# Altium PCB IoT_Uni_Tem_PCB.PcbDoc
Units mm, origin at the board's own origin, x right, y up, seen from the top; angles counter-clockwise.
Board outline 85 x 58 mm, 2 copper layers (Top Layer, Bottom Layer), stack 1.671 mm thick; 28 components, 22 nets, 113 pads, 38 vias.
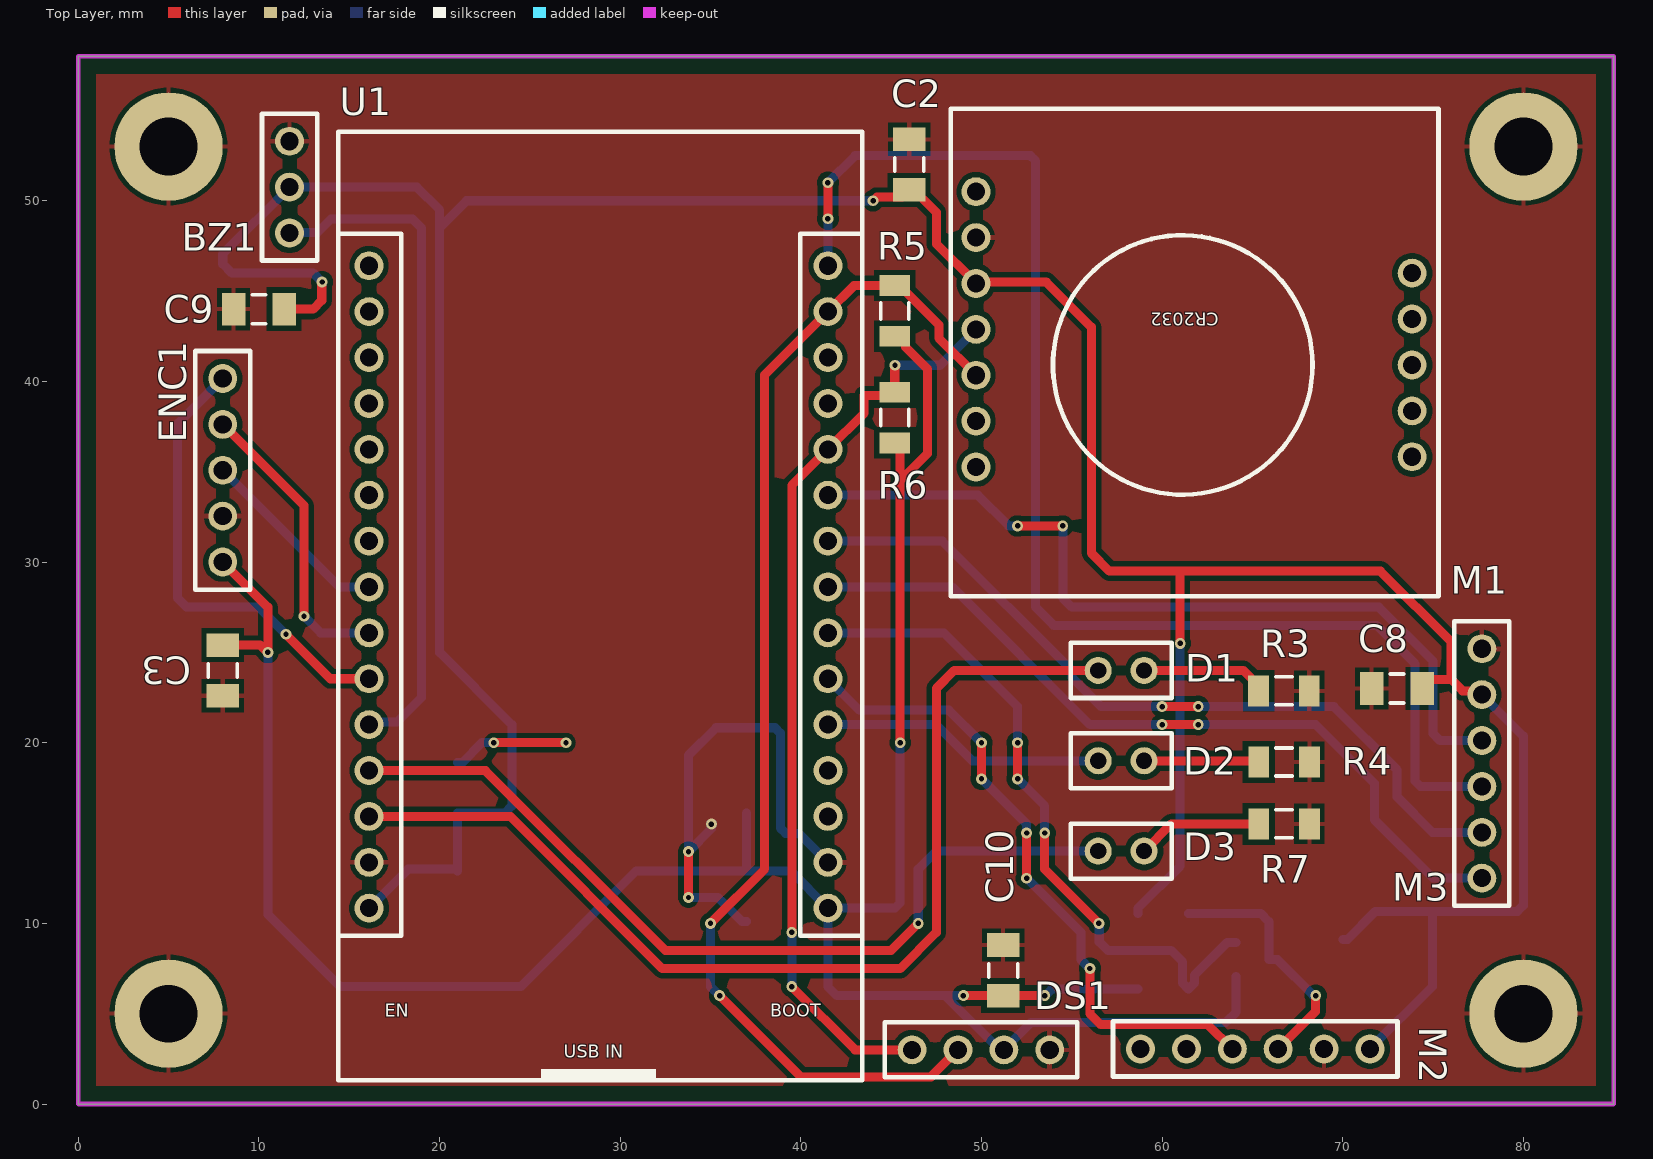
[diagram p0: Top Layer view]
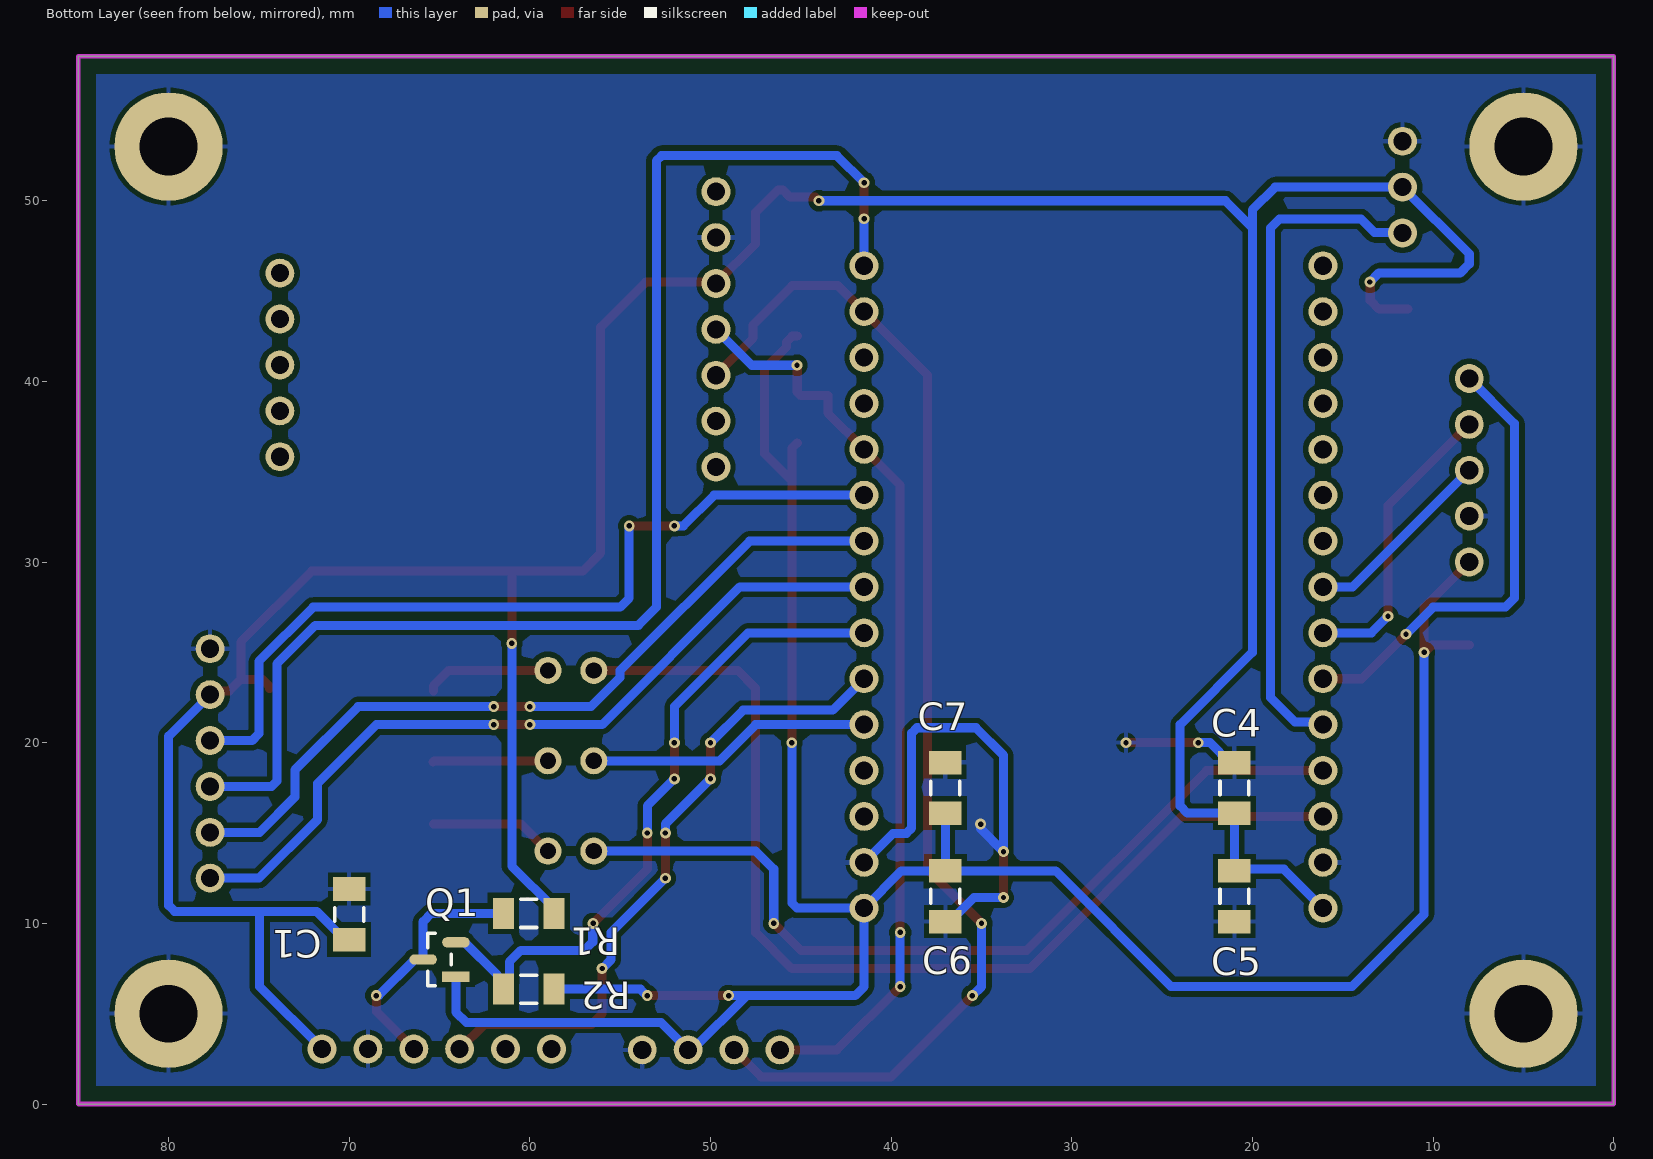
[diagram p1: Bottom Layer view, seen from below]
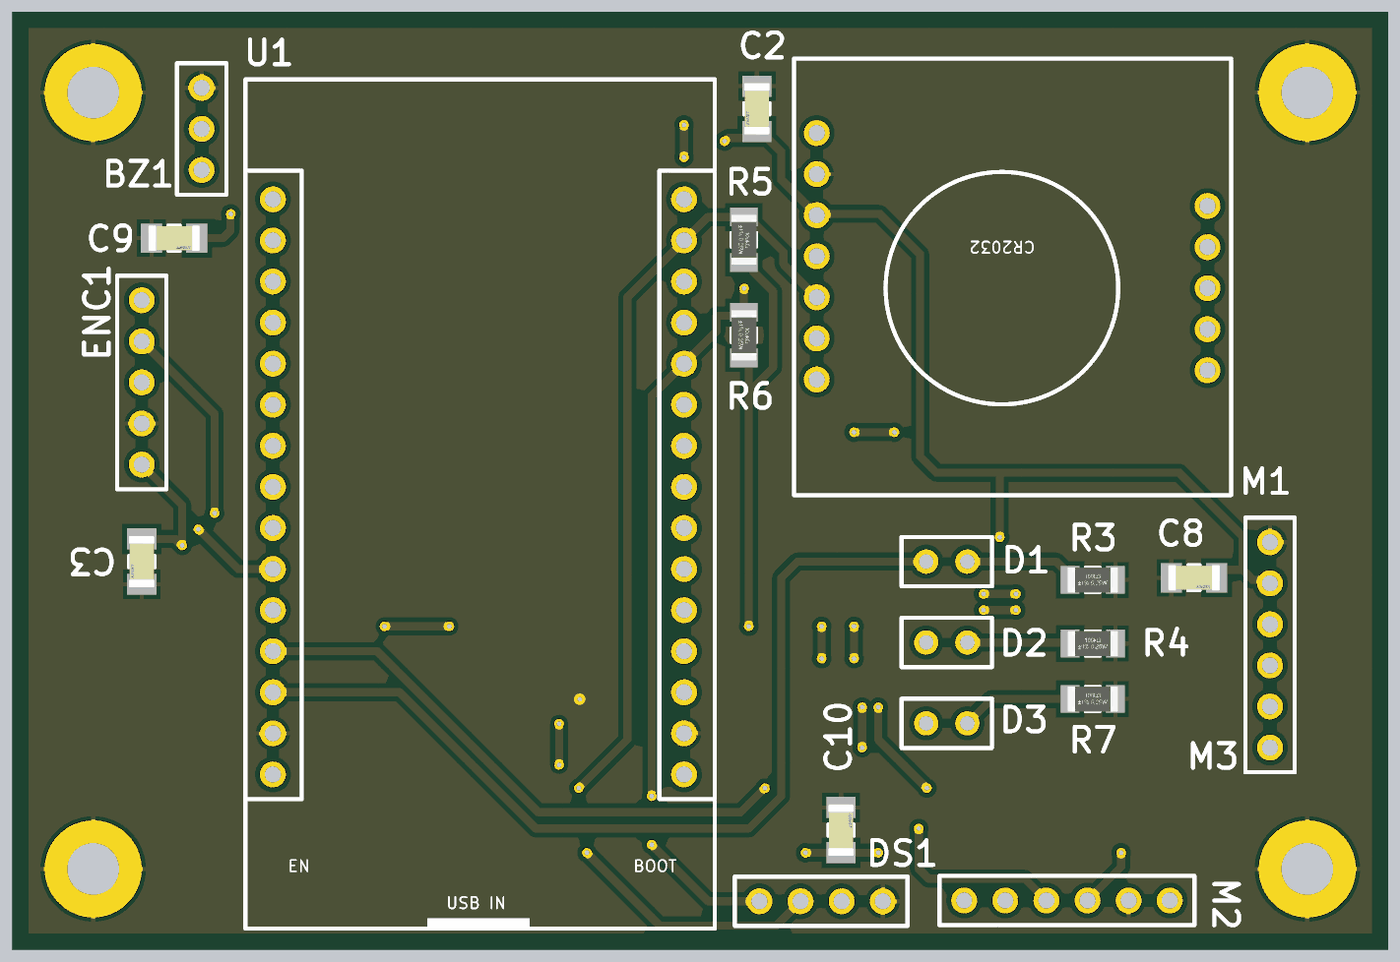
[diagram p2: 3D render of the assembled board from above, using the file's embedded part models]
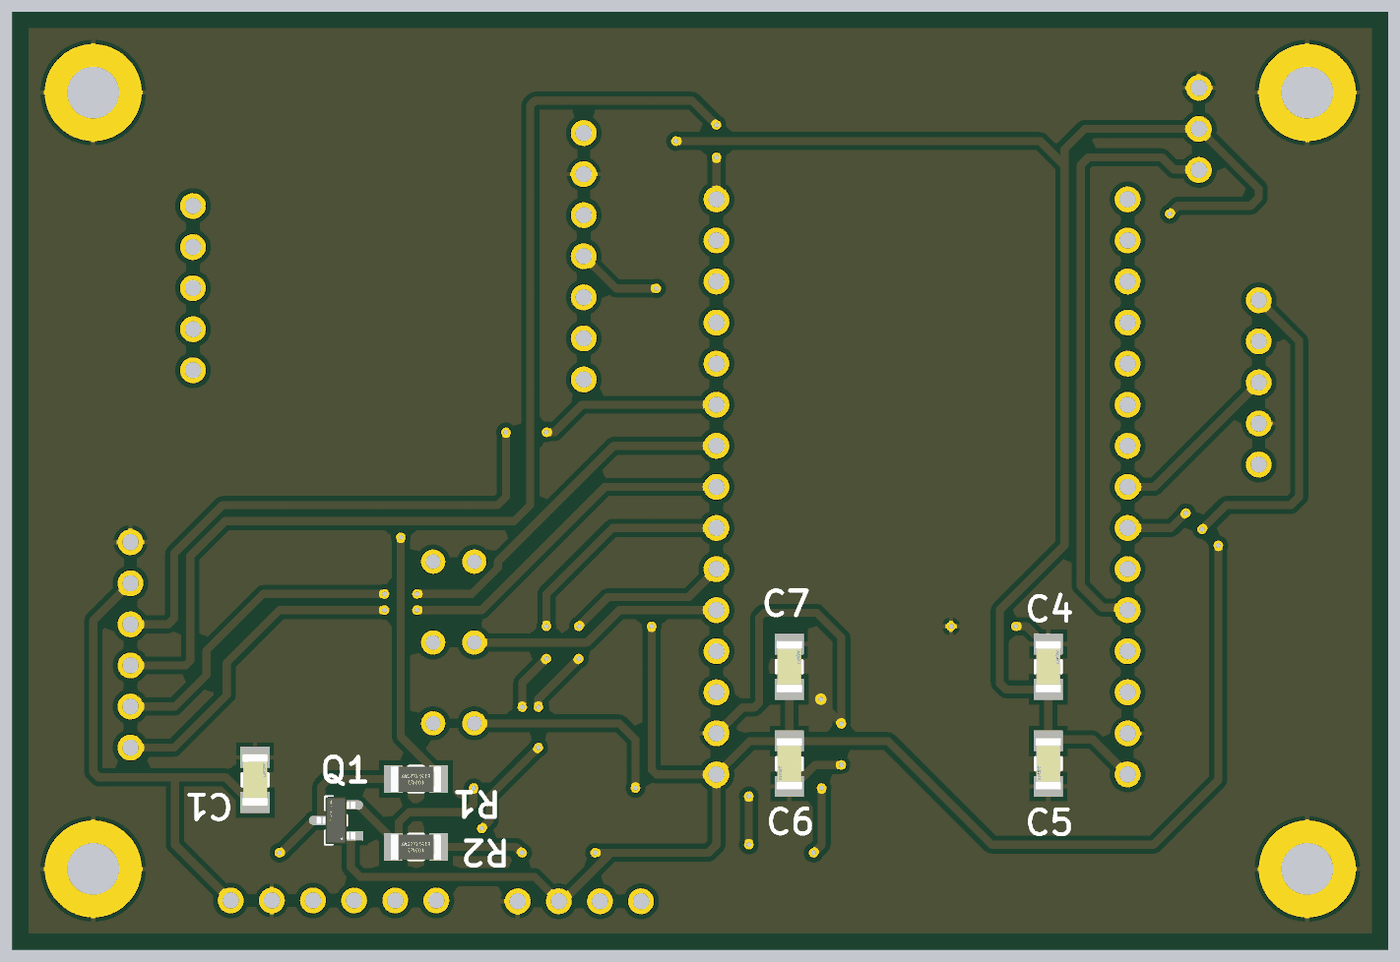
[diagram p3: 3D render of the assembled board from below, using the file's embedded part models]

## Layer stack, top to bottom
Top Solder: solder mask 0.0102, Solder Resist, Dk 3.5
Top Layer: signal copper 0.0356
Dielectric 1: dielectric 1.6, FR-4, Dk 4.8
Bottom Layer: signal copper 0.0356
Bottom Solder: solder mask 0.0102, Solder Resist, Dk 3.5

## Board outline
0,0 85,0 85,58 0,58

## Design rules (kind name [scope] priority, off if disabled: settings)
BoardOutlineClearance [All] p1: gap=0.5 ignorepadtopadclearanceinfootprint=FALSE except(0: Arc-SplitContinuation Track-SplitContinuation SMDPad-SplitContinuation THPad-SplitContinuation Via-SplitContinuation Fill-SplitContinuation Poly-SplitContinuation Region-SplitContinuation Text-SplitContinuation)
Clearance [All] p1: gap=0.3 ignorepadtopadclearanceinfootprint=FALSE
HoleSize [All] p1: absolutevalues=TRUE maxlimit=3.6 minlimit=0.025 maxpercent=80.000 minpercent=20.000
PolygonConnect [All] p1: connectstyle=Relief reliefconductorwidth=0.254 reliefentries=4 polygonreliefangle="90 Angle" airgapwidth=0.254
RoutingVias [All] p1: holewidth=0.3 width=0.6 viastyle="Through Hole" minholewidth=0.3 minwidth=0.6 maxholewidth=0.3 maxwidth=0.6
SilkToSolderMaskClearance [IsPad] p1: minsilkscreentomaskgap=0.15 clearancetoexposedcopper=TRUE
SolderMaskExpansion [All] p1: expansion=0.05 istentingtop=FALSE
SupplyNets "Schematic Supply Nets" [InNet('GND')] p1: voltage=0.000
Width Power_Width [InNet('V5V0') OR InNet('V3V3') OR InNet('GND')] p1: maxlimit=1 minlimit=0.5 preferedwidth=0.5
Width [All] p2: maxlimit=1 minlimit=0.3 preferedwidth=0.5
28 further rules are at their usual default settings.

## Components (designator, comment, footprint, x,y, rotation, side; value= is the part's Value field where it differs from the comment)
BZ1 "Buzzer" MOJE_ZLACZE_3PIN 11.698,50.754 r180 top
C1 "100nF" Capacitor_FP-C1206C-EB-IPC_B 70,10.5 r270 bottom
C2 "100nF" Capacitor_FP-C1206C-EB-IPC_B 46,52 r90 top
C3 "100nF" Capacitor_FP-C1206C-EB-IPC_B 8,24 r90 top
C4 "100nF" Capacitor_FP-C1206C-EB-IPC_B 21,17.5 r270 bottom
C5 "100nF" Capacitor_FP-C1206C-EB-IPC_B 21,11.5 r90 bottom value=10µF
C6 "100nF" Capacitor_FP-C1206C-EB-IPC_B 37,11.5 r90 bottom
C7 "10µF" Capacitor_FP-C1206C-EB-IPC_B 37,17.5 r270 bottom
C8 "100nF" Capacitor_FP-C1206C-EB-IPC_B 73,23 r180 top
C9 "100nF" Capacitor_FP-C1206C-EB-IPC_B 10,44 r180 top
C10 "100nF" Capacitor_FP-C1206C-EB-IPC_B 51.198,7.401 r270 top
D1 "GREEN" MOJE_ZLACZE_2PIN 59,24 r90 top
D2 "YELLOW" MOJE_ZLACZE_2PIN 59,19 r90 top
D3 "RED" MOJE_ZLACZE_2PIN 59,14 r90 top
DS1 "OLED SH1106 driver" MOJE_ZLACZE_4PIN 48.698,3 r90 top
ENC1 "Waveshare 9533" MOJE_ZLACZE_5PIN 8,35.08 r0 top
M1 "DS1307 Battery-powered RTC" RTC_DS1307 61.138,40.91 r180 top
M2 "R307s Fingerprint sensor" MOJE_ZLACZE_6PIN 65.154,3.048 r270 top
M3 "MicroSD reader module" MOJE_ZLACZE_6PIN 77.698,18.85 r180 top
Q1 "BSS138" BSS138 65,8 r0 bottom
R1 "10k" "RESISTOR 1206" 60.056,10.549 r0 bottom value=10K
R2 "10k" "RESISTOR 1206" 60.056,6.358 r0 bottom value=10K
R3 "10k" "RESISTOR 1206" 66.743,22.871 r0 top value=1K2
R4 "10k" "RESISTOR 1206" 66.751,18.934 r0 top value=1K2
R5 "10k" "RESISTOR 1206" 45.198,43.901 r270 top value=4K7
R6 "10k" "RESISTOR 1206" 45.198,38 r270 top value=4K7
R7 "10k" "RESISTOR 1206" 66.747,15.505 r0 top value=1K2
U1 "ESP32-DevKitC" ESP32_DEVKITC_WROOM-32_15X2PIN 28.8,28.62 r0 top

## Footprints (in the part's own frame and the unit in brackets; to place one, negate y for a bottom-side part, rotate by r counter-clockwise, add the part's x,y. Pads: shape width x height; smd on the part's side, far side on the other; paste and mask are expansions set on the pad)
BSS138 [mm]
  rect 1.524x0.578 smd paste+0 mask+0: 1(-0.91,0.95)
  rrect100% 1.524x0.578 smd paste+0 mask+0: 2(-0.91,-0.95) 3(0.91,0)
  silkscreen extent -0.65,-1.45 0.65,1.45, body extent -1.2,-1.45 1.2,1.45, height 1.11
Capacitor_FP-C1206C-EB-IPC_B [mm]
  rect 1.305x1.806 smd paste+0 mask+0: 1(-1.401,0) 2(1.401,0)
  silkscreen extent -0.37,-0.8 0.37,0.8, body extent -1.6,-0.8 1.6,0.8, height 0.88
ESP32_DEVKITC_WROOM-32_15X2PIN [mm]
  round 1.6 hole 1: 1(-12.7,17.78) 2(-12.7,15.24) 3(-12.7,12.7) 4(-12.7,10.16) 5(-12.7,7.62) 6(-12.7,5.08) 7(-12.7,2.54) 8(-12.7,0) 9(-12.7,-2.54) 10(-12.7,-5.08) 11(-12.7,-7.62) 12(-12.7,-10.16) 13(-12.7,-12.7) 14(-12.7,-15.24) 15(-12.7,-17.78) 16(12.7,-17.78) 17(12.7,-15.24) 18(12.7,-12.7) 19(12.7,-10.16) 20(12.7,-7.62) 21(12.7,-5.08) 22(12.7,-2.54) 23(12.7,0) 24(12.7,2.54) 25(12.7,5.08) 26(12.7,7.62) 27(12.7,10.16) 28(12.7,12.7) 29(12.7,15.24) 30(12.7,17.78)
  silkscreen extent -14.4,-27.3 14.6,25.19
MOJE_ZLACZE_2PIN [mm]
  round 1.5 hole 0.9: 1(0,2.54) 2(0,0)
  silkscreen extent -1.52,-1.52 1.52,4.06
MOJE_ZLACZE_3PIN [mm]
  round 1.6 hole 1: 1(0,2.54) 2(0,0) 3(0,-2.54)
  silkscreen extent -1.52,-4.06 1.52,4.06
MOJE_ZLACZE_4PIN [mm]
  round 1.6 hole 1: 1(0,2.54) 2(0,0) 3(0,-2.54) 4(0,-5.08)
  silkscreen extent -1.52,-6.6 1.52,4.06
MOJE_ZLACZE_5PIN [mm]
  round 1.6 hole 1: 1(0,5.08) 2(0,2.54) 3(0,0) 4(0,-2.54) 5(0,-5.08)
  silkscreen extent -1.52,-6.6 1.52,6.6
MOJE_ZLACZE_6PIN [mm]
  round 1.6 hole 1: 1(0,6.35) 2(0,3.81) 3(0,1.27) 4(0,-1.27) 5(0,-3.81) 6(0,-6.35)
  silkscreen extent -1.52,-7.87 1.52,7.87
"RESISTOR 1206" [mm]
  rect 1.156x1.71 smd paste+0 mask+0: 1(-1.401,0) 2(1.401,0)
  silkscreen extent -0.45,-0.78 0.45,0.77, body extent -1.55,-0.77 1.55,0.77, height 0.65
RTC_DS1307 [mm]
  round 1.6 hole 1: 1(-12.7,5.08) 2(-12.7,2.54) 3(-12.7,0) 4(-12.7,-2.54) 5(-12.7,-5.08) 6(11.44,5.65) 7(11.44,3.11) 8(11.44,0.57) 9(11.44,-1.97) 10(11.44,-4.51) 11(11.44,-7.05) 12(11.44,-9.59)
  silkscreen extent -14.16,-14.19 12.84,12.81

## Part data
BZ1: "positive, negative terminals + input signal"
C1 C2 C3 C4 C5 C6 C7 C8 C9 C10: library part Cap, "Capacitor", LatestRevisionDate=17-Jul-2002, LatestRevisionNote="Re-released for DXP Platform.", PackageDescription="Radial Cap, Thru-Hole; 2 Leads; 0.3 in Pin Spacing", PackageReference=RAD-0.3, Published=8-Jun-2000, Publisher="Altium Limited"
D1 D2 D3: library part LED2, "Typical RED, GREEN, YELLOW, AMBER GaAs LED", LatestRevisionDate=17-Jul-2002, LatestRevisionNote="Re-released for DXP Platform.", PackageDescription="SM LED; 2 Flat Leads", PackageReference=3.2X1.6X1.1, PackageVersion=Feb-2002, Published=8-Jun-2000, Publisher="Altium Limited"
DS1: library part "OLED 1,3\"", "Blue 1.3\" graphics OLED display 128x64px I2C v2 - Blue Font"
ENC1: "compact rotary encoder module featuring a built-in button, designed to detect clockwise and anti-clockwise rotation for menu navigation, volume control, or motor positioning"
M1: library part "RTC DS1307", "RTC CR2032 BATTERY POWERED, REAL TIME CLOCK. I2C + 32kB EEPROM"
M2: library part "GROW R307S", "optical fingerprint sensor module from Hangzhou Grow Technology Co., Ltd. It features a high-speed DSP processor, flash memory for storage"
M3: library part "microSD Card module", "SPI INTERFACE, 2.54mm, 3.3V - 5.0V"
Q1: library part MOSFET-N, "N-Channel MOSFET", LatestRevisionDate=17-Jul-2002, LatestRevisionNote="Re-released for DXP Platform.", PackageDescription="TO, Flat Index; 3 In-Line, Axial Leads; Body Dia. 4.6mm; Lead Dia. 0.5 mm (max)", PackageReference=E3, PackageVersion=1995/1996, Published=8-Jun-2000, Publisher="Altium Limited"
R1 R2 R3 R4 R5 R6 R7: library part Res2, "Resistor", LatestRevisionDate=17-Jul-2002, LatestRevisionNote="Re-released for DXP Platform.", PackageDescription="Axial Device, Thru-Hole; 2 Leads; 0.4 in Pin Spacing", PackageReference=AXIAL-0.4, Published=8-Jun-2000, Publisher="Altium Limited"
U1: "ESP32-based development board produced by Espressif"

## Free pads (board coordinates)
  round 6 hole 3.2: H1(5,53) H2(80,53) H3(80,5) H4(5,5)

## Via types
v1: diameter 0.6, hole 0.3, Top Layer to Bottom Layer, 38 vias

## Nets (pads, with @x,y where several pads share a name; then routed paths per layer and width w, separated by ;. In a path a pad name is that pad's centre, name@x,y a point inside that pad or via, vN(x,y) a via of type N, cw(c..) or ccw(c..) an arc to the next point about the centre after c; other vN are vias at no path point)
BUZZER_SIG: BZ1.1 U1.11 | length 37.4
  Bottom Layer w0.5: BZ1.1 11.732,48.248 13.248,48.248 14,49 18.5,49 19,48.5 19,22.5 17.65,21.15 16.25,21.15 U1.11
ENC_SIA: ENC1.1 U1.10 | length 25.6
  Top Layer w0.5: v1(11.5,26) 13.96,23.54 U1.10
  Bottom Layer w0.5: ENC1.1 5.5,37.66 5.5,28 6,27.5 10,27.5 v1(11.5,26)
ENC_SIB: ENC1.2 U1.9 | length 16.5
  Top Layer w0.5: ENC1.2 12.5,33.12 v1(12.5,27)
  Bottom Layer w0.5: v1(12.5,27) 13.42,26.08 U1.9
ENC_SW: ENC1.3 U1.8 | length 10.8
  Bottom Layer w0.5: ENC1.3 14.46,28.62 U1.8
FP_RX: Q1.2 R2.2 U1.22 | length 37.8
  Top Layer w0.5: v1(52,18) v1(52,20) ; v1(53.5,15) 53.5,13 v1(56.5,10)
  Bottom Layer w0.5: U1.22 47.92,26.08 52,22 v1(52,20) ; v1(52,18) 53.5,16.5 v1(53.5,15) ; v1(56.5,10) 56.519,9.981 56.519,8.981 57,8.5 60.5,8.5 61.129,7.871 61.129,6.686 R2.2 61.785,6.686 61.785,7.119 63.617,8.95 Q1.2
FP_TX: M2.4 U1.21 | length 36.1
  Top Layer w0.5: v1(50,18) v1(50,20) ; v1(52.5,12.5) v1(52.5,15) ; v1(56,7.5) 56,5 56.602,4.398 62.534,4.398 M2.4
  Bottom Layer w0.5: U1.21 43.24,21.8 48.2,21.8 v1(50,20) ; v1(50,18) 52.5,15.5 v1(52.5,15) ; v1(52.5,12.5) 55.5,9.5 55.5,8 v1(56,7.5)
GND: BZ1.3 C1.1 C2.2 C3.1 C4.1 C5.1 C6.1 C7.1 C8.2 C9.2 C10.1 DS1.4 ENC1.4 M1.11 M2.2 M3.6 pad.H1 pad.H2 pad.H3 pad.H4 R3.2 R4.2 R7.2 U1.14 U1.17 | length 34.7
  Top Layer w0.5: v1(23,20) v1(27,20) ; v1(33.782,11.43) v1(33.782,13.97)
  Bottom Layer w0.5: C4.1 21.251,18.901 22.35,20 v1(23,20) ; v1(33.782,11.43) 35.418,11.43 36.749,10.099 C6.1 ; v1(35.052,15.494) 35.052,15.24 v1(33.782,13.97) 33.782,19.304 35.306,20.828 38.569,20.828 38.862,20.535 38.862,15.279 39.155,14.986 39.894,14.986 U1.17
I2C_SCL: DS1.2 M1.8 R5.1 U1.29 | length 67.7
  Top Layer w0.5: v1(35,10) 38,13 38,40.36 U1.29 42.942,45.302 R5.1 45.475,45.302 47.645,43.132 47.645,42.393 M1.8 ; v1(35.5,6) 40,1.5 47.198,1.5 DS1.2
  Bottom Layer w0.5: v1(35,10) 35,6.5 v1(35.5,6)
I2C_SDA: DS1.1 M1.9 R6.1 U1.26 | length 51.1
  Top Layer w0.5: v1(39.5,6.5) 43,3 DS1.1 ; v1(39.5,9.5) 39.5,34.24 U1.26 43.5,38.24 43.5,39.207 45.004,39.207 R6.1 45.198,40.88 v1(45.212,40.894)
  Bottom Layer w0.5: v1(39.5,6.5) v1(39.5,9.5) ; v1(45.212,40.894) 47.712,40.894 M1.9
LED_GREEN: D1.1 U1.13 | length 58.6
  Top Layer w0.5: U1.13 23.92,15.92 32.34,7.5 45.5,7.5 47.5,9.5 47.5,23 48.5,24 D1.1
LED_RED: D3.1 U1.12 | length 48.5
  Top Layer w0.5: U1.12 22.54,18.46 32.5,8.5 45,8.5 v1(46.5,10)
  Bottom Layer w0.5: v1(46.5,10) 46.5,13 47.5,14 D3.1
LED_YELLOW: D2.1 U1.20 | length 15.8
  Bottom Layer w0.5: U1.20 47.5,21 49.5,19 D2.1
NetD1_2: D1.2 R3.1 | length 7
  Top Layer w0.5: D1.2 64.49,24 65.342,23.148 R3.1
NetD2_2: D2.2 R4.1 | length 6.4
  Top Layer w0.5: D2.2 65.284,19 R4.1
NetD3_2: D3.2 R7.1 | length 7
  Top Layer w0.5: D3.2 60.505,15.505 R7.1
NetM2_3: M2.3 Q1.3 R1.2 | length 14
  Top Layer w0.5: M2.3 68.5,5.124 v1(68.5,6)
  Bottom Layer w0.5: R1.2 65.451,10.549 65.91,10.09 Q1.3 66.383,8 68.364,6.019 68.481,6.019 v1(68.5,6)
SD_CS: M3.1 U1.23 | length 44
  Top Layer w0.5: v1(60,21) v1(62,21)
  Bottom Layer w0.5: U1.23 48.38,28.62 56,21 v1(60,21) ; v1(62,21) 68.5,21 71.75,17.75 71.75,15.75 75,12.5 M3.1
SPI_CLK: M3.2 U1.24 | length 44
  Top Layer w0.5: v1(60,22) v1(62,22)
  Bottom Layer w0.5: U1.24 47.84,31.16 55,24 55,23.622 56.622,22 v1(60,22) ; v1(62,22) 69.5,22 73,18.5 73,17 74.96,15.04 M3.2
SPI_MISO: M3.4 U1.25 | length 46.5
  Top Layer w0.5: v1(52,32) v1(54.5,32)
  Bottom Layer w0.5: U1.25 49.8,33.7 51.5,32 v1(52,32) ; v1(54.5,32) 54.5,28 55,27.5 72,27.5 75,24.5 75,20.5 75.38,20.12 M3.4
SPI_MOSI: M3.3 U1.30 | length 74.2
  Top Layer w0.5: v1(41.5,49) v1(41.5,51)
  Bottom Layer w0.5: U1.30 v1(41.5,49) ; v1(41.5,51) 43,52.5 52.707,52.5 53,52.207 53,27.5 54,26.5 71.869,26.5 74,24.369 74,17.873 74.293,17.58 M3.3
V3V3: C3.2 C6.2 C7.2 C10.2 DS1.3 ENC1.5 Q1.1 R2.1 R5.2 R6.2 U1.16 | length 143.8
  Top Layer w0.5: C3.2 10.072,25.401 10.473,25 v1(10.5,25) 10.5,27.5 ENC1.5 ; R6.2 45.5,36.297 45.5,34.5 ; R5.2 45.475,42.5 45.803,42.172 45.803,41.895 47,40.698 47,36 45.5,34.5 ; v1(45.5,20) 45.5,34.5 ; v1(49,6) C10.2 v1(53.5,6)
  Bottom Layer w0.5: v1(10.5,25) 10.5,10.5 14.5,6.5 24.5,6.5 30.901,12.901 C6.2 ; C7.2 C6.2 ; v1(45.5,20) 45.5,11.133 45.207,10.84 U1.16 ; v1(49,6) 48,6 ; v1(53.5,6) 53.527,6 53.885,6.358 R2.1 ; Q1.1 64.09,5.09 63.5,4.5 52.738,4.5 DS1.3 51,3 48,6 ; C6.2 39.439,12.901 U1.16 ; U1.16 41.5,6.5 42,6 48,6
V5V0: BZ1.2 C1.2 C2.1 C4.2 C5.2 C8.1 C9.1 M1.10 M2.1 M3.5 R1.1 U1.15 | length 204.7
  Top Layer w0.5: C9.1 13,44 13.481,44.481 13.481,45.481 v1(13.5,45.5) ; v1(44,50) 44.027,50 44.225,50.198 45.599,50.198 C2.1 46.251,50.599 47.5,49.35 47.5,47.618 M1.10 49.778,45.5 53.584,45.5 56.084,43 56.084,30.5 57.084,29.5 61,29.5 ; v1(61,25.5) 61,29.5 ; C8.1 74.401,23.098 74.803,23.5 76,23.5 ; M3.5 77.488,22.87 76.63,22.87 76,23.5 ; 61,29.5 72.084,29.5 76,25.584 76,23.5
  Bottom Layer w0.5: v1(13.5,45.5) 13,46 8.5,46 8,46.5 8,47.056 BZ1.2 18.746,50.754 20,49.5 20,48.5 ; U1.15 18.26,13 20.901,13 C5.2 C4.2 23.599,16.099 24,16.5 24,21 20,25 20,48.5 ; v1(44,50) 21.5,50 20,48.5 ; R1.1 58.655,10.826 61,13.171 v1(61,25.5) ; C1.2 70.251,9.099 71.809,10.658 74.954,10.658 ; M2.1 74.954,6.498 74.954,10.658 ; M3.5 80,20.358 80,11 79.658,10.658 74.954,10.658
pads on no net: M1.1 M1.2 M1.3 M1.4 M1.5 M1.6 M1.7 M1.12 M2.5 M2.6 U1.1 U1.2 U1.3 U1.4 U1.5 U1.6 U1.7 U1.18 U1.19 U1.27 U1.28

## Polygon pours and split planes (outlines as drawn)
GND on Bottom Layer "Ground" (solid, pour order 2): 84,57 84,1 1,1 1,57
GND on Top Layer "Ground" (solid, pour order 0): 1,57 84,57 84,1 1,1

## Keep-outs
Keep-Out Layer:
  lines w0.254: 0,57 0,58 ; 0,58 85,58 85,0 0,0 0,44 0,58

## Text inside footprints (layer, text, board x,y; h text height)
M1: Top Assembly "CR2032" at 63.121,43.8 h0.7 r180; Top Overlay "CR2032" at 63.121,43.8 h0.7 r180
U1: Top Assembly "BOOT" at 38.298,4.844 h0.7; Top Assembly "EN" at 16.962,4.844 h0.7; Top Assembly "USB IN" at 26.876,2.558 h0.7; Top Overlay "BOOT" at 38.298,4.844 h0.7; Top Overlay "EN" at 16.962,4.844 h0.7; Top Overlay "USB IN" at 26.876,2.558 h0.7